# EAGLE board v2_electrical_design (EAGLE 9.7.0)

Size 147.34 x 121.49 mm. Coordinates in mm from the lower left corner, seen from the top.
Outline: 0,0 147.34,0 147.34,121.49 0,121.49 0,0
Copper layers (1*16): Top 0.035mm / dielectric 1.5mm / Bottom 0.035mm
Design rules "default": minimum track width 6mil, minimum drill 0.35mm, track to track 6mil, track to pad 6mil, pad to pad 6mil, via to via 6mil, smd to smd 6mil, copper to edge 40mil, drill to drill 6mil, minimum pad ring 10mil, minimum via ring 8mil, stop-mask expansion 4mil, vias tented up to drill 0mil, thermal gap 10mil

## Footprints (pad centres in the part's own frame; a part is rotated, then mirrored left to right if it is on the bottom)
CAP-THRU-2.54MM = drill 1.016 pad 1.88: 1 -1.27,0; 2 1.27,0
CAPPRD254W65D500H1150B = drill 0.85 pad 1.45: 1 -1.27,0; 2 1.27,0
DIODE-AXIAL = drill 1: 1 -5.08,0; 2 5.08,0
MOTOR = drill 1.118 pad 3.15 octagon: + 2.54,0; - -2.54,0
MIC127-140-A01 = smd 0.8 x 2.502: P$1 24.765,2.54; P$2 23.495,2.54; P$3 22.225,2.54; P$4 20.955,2.54; P$5 19.685,2.54; P$6 18.415,2.54; P$7 17.145,2.54; P$8 15.875,2.54; P$9 14.605,2.54; P$10 13.335,2.54; P$11 12.065,2.54; P$12 10.795,2.54; P$13 9.525,2.54; P$14 8.255,2.54; P$15 6.985,2.54; P$16 5.715,2.54; P$17 4.445,2.54; P$18 3.175,2.54; P$19 1.905,2.54; P$20 0.635,2.54; P$21 -0.635,2.54; P$22 -1.905,2.54; P$23 -3.175,2.54; P$24 -4.445,2.54; P$25 -5.715,2.54; P$26 -6.985,2.54; P$27 -8.255,2.54; P$28 -9.525,2.54; P$29 -10.795,2.54; P$30 -12.065,2.54; P$31 -13.335,2.54; P$32 -14.605,2.54; P$33 -15.875,2.54; P$34 -17.145,2.54; P$35 -18.415,2.54; P$36 -19.685,2.54; P$37 -20.955,2.54; P$38 -22.225,2.54; P$39 -23.495,2.54; P$40 -24.765,2.54 | drill 1.1 pad 2.3: P$41 26.899,-1.168; P$42 -26.899,-1.168
BATTERY-GENERIC = drill 1.118 pad 3.15 octagon: + 2.54,0; - -2.54,0
RESAD1016W63L850D250B = drill 0.83 pad 1.43: 1 -5.08,0; 2 5.08,0
SEN-13322 = drill 1.016 long: 1 -2.54,0; 2 0,0; 3 2.54,0
TO220BV = drill 1.016 long: D 0,-2.54; G -2.54,-2.54; S 2.54,-2.54

## Placement (x,y rotation side)
C1_CER  100n  [CAP-THRU-2.54MM]  126.9,24.29 0 top
C2_EL  220u  [CAPPRD254W65D500H1150B]  141.6,42.75 180 top
D1_1N4007  DIODEDIODE-AXIAL  [DIODE-AXIAL]  126.29,19.86 180 top
M1  MOTOR_HDR  [MOTOR]  126.02,8.26 180 top
MB1  MICRO:BIT_MIC127  [MIC127-140-A01]  61.59,110.7 180 top
P1  BATTERYGENERIC  [BATTERY-GENERIC]  8.26,96.09 180 top
R1  100  [RESAD1016W63L850D250B]  123.83,47.83 0 top
R2  10k  [RESAD1016W63L850D250B]  128.91,40.21 90 top
SEN0308  SEN-13322  [SEN-13322]  34.95,18.24 0 top
T1_IRLZ44N  NMOSFET  [TO220BV]  131.44,55.45 0 top

## Library data of the parts
C1_CER C2_EL D1_1N4007 M1 MB1 P1 R1 R2 SEN0308 = Tinkercad
T1_IRLZ44N = Tinkercad; CATEGORY: Transistor; SUB-CATEGORY: MOSFET; TYPE: N-Channel

## Nets
M1_-: C1_CER.2 D1_1N4007.1 M1.- T1_IRLZ44N.D
MB1_3.3V: MB1.P$27 MB1.P$28 MB1.P$29 MB1.P$30 MB1.P$31 MB1.P$32 SEN0308.1
MB1_P2: MB1.P$19 MB1.P$20 MB1.P$21 MB1.P$22 SEN0308.3
MB1_P8: MB1.P$14 R1.1
P1+: C1_CER.1 C2_EL.1 D1_1N4007.2 M1.+ P1.+
P1-: C2_EL.2 MB1.P$35 MB1.P$36 MB1.P$37 MB1.P$38 MB1.P$39 MB1.P$40 P1.- R2.1 SEN0308.2 T1_IRLZ44N.S
T1_IRLZ44N_G: R1.2 R2.2 T1_IRLZ44N.G

## Tracks (layer width: path | path; a pad name or v marks a point on that pad's centre or on a via)
M1_-  (3 unrouted)
MB1_3.3V  (6 unrouted)
MB1_P2  (4 unrouted)
MB1_P8  (1 unrouted)
P1+  (4 unrouted)
P1-  (10 unrouted)
T1_IRLZ44N_G  (2 unrouted)